# Altium PCB 12V-036A3（7X7）-WaterPump-200W-V1.0.PcbDoc (part 1 of 2)
Units mm, origin at the board's own origin, x right, y up, seen from the top; angles counter-clockwise.
Board outline 61.5 x 61.42 mm, 4 copper layers (Top Layer, Signal Layer 1, Signal Layer 2, Bottom Layer), stack 0.778 mm thick; 140 components, 56 nets, 337 pads, 796 vias.
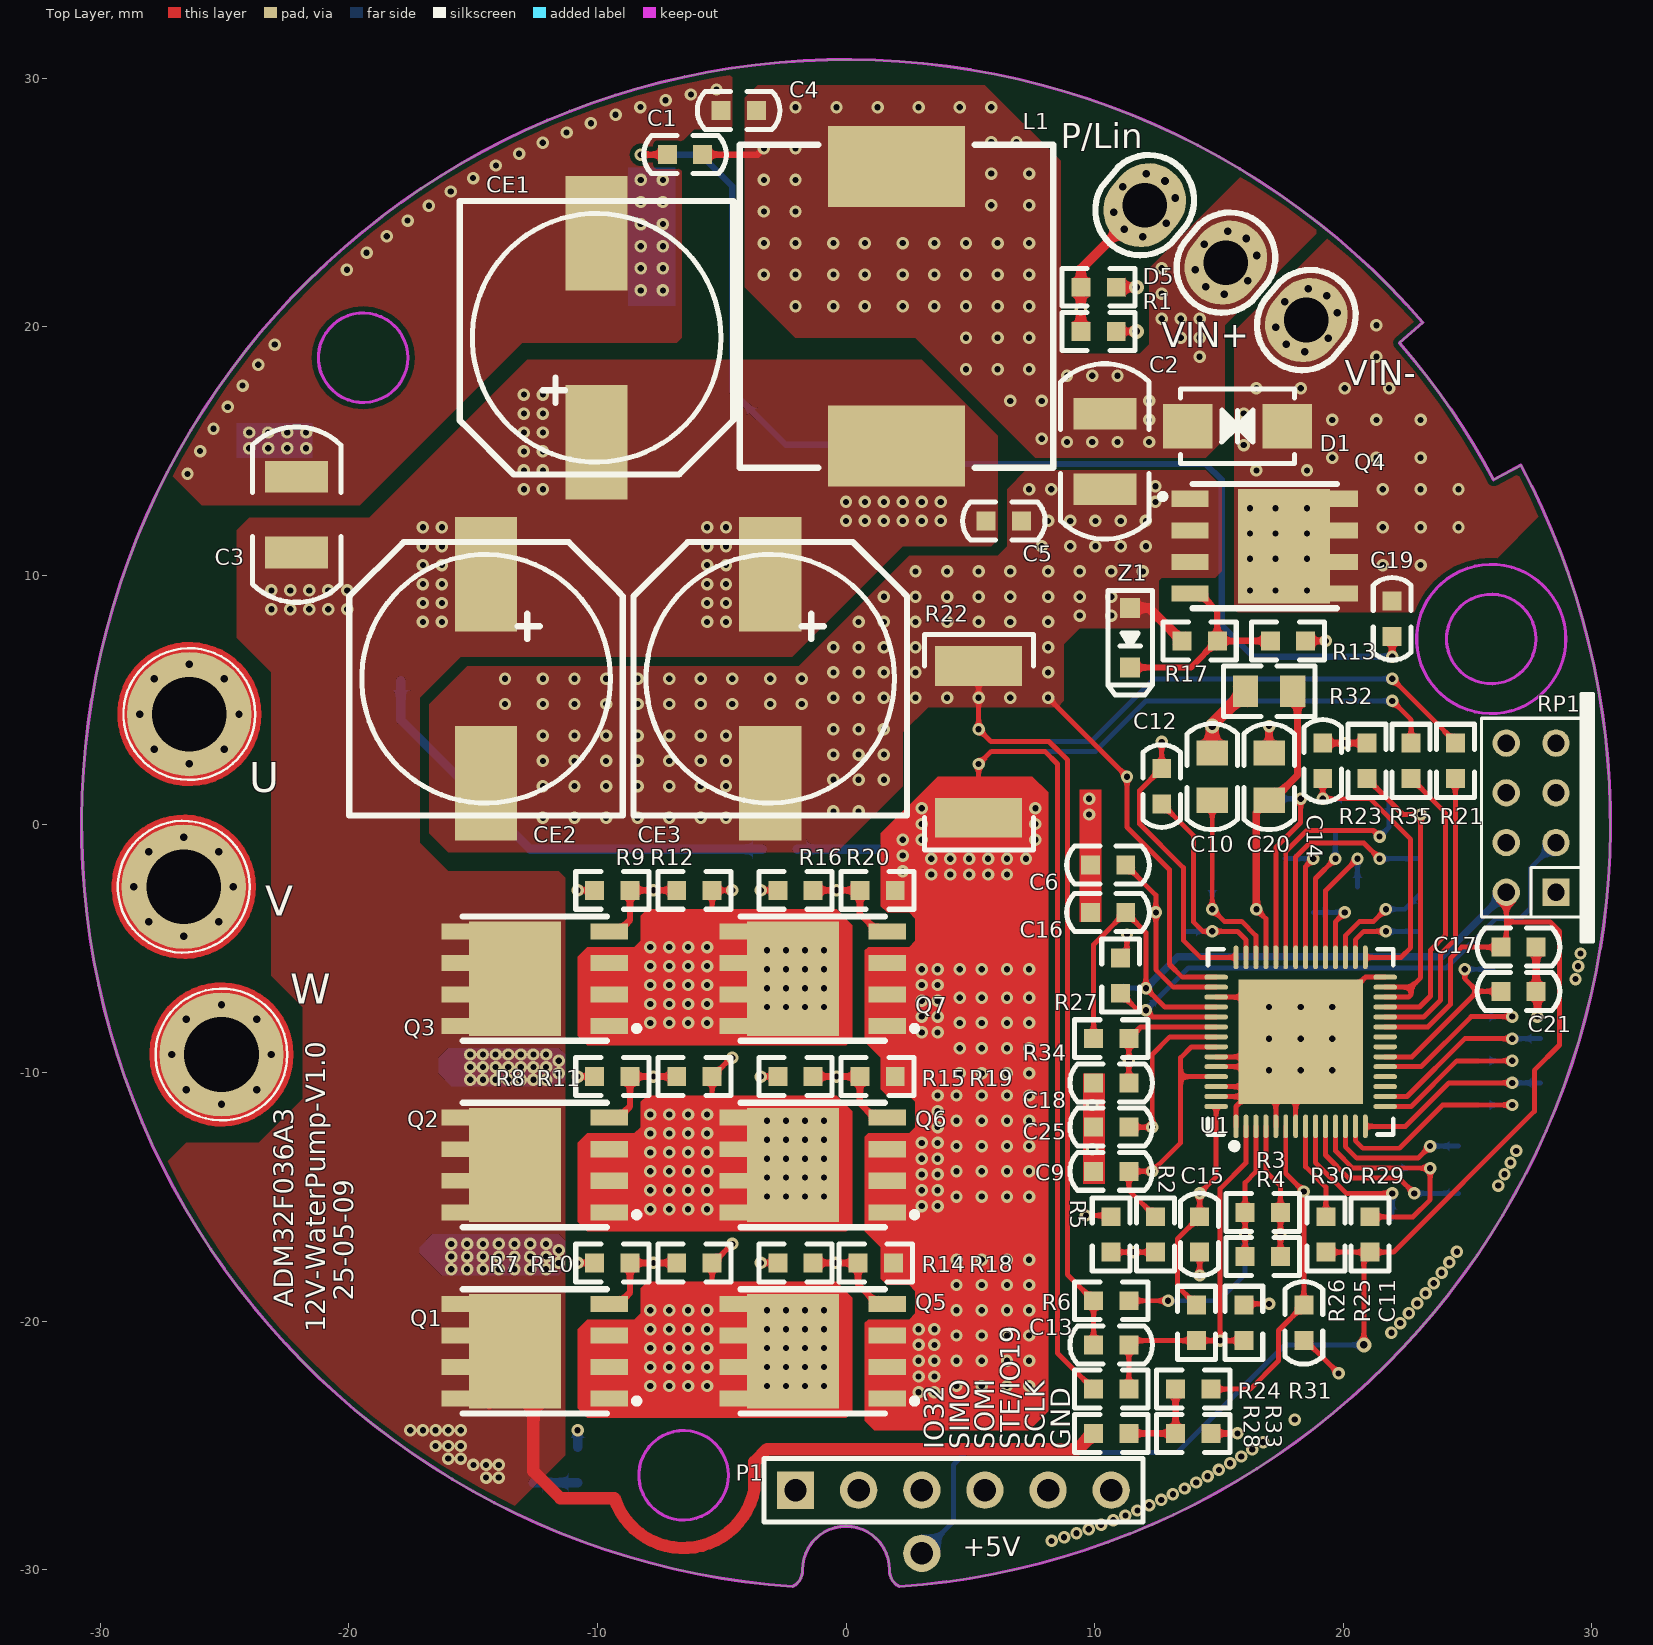
[diagram p0: Top Layer view]
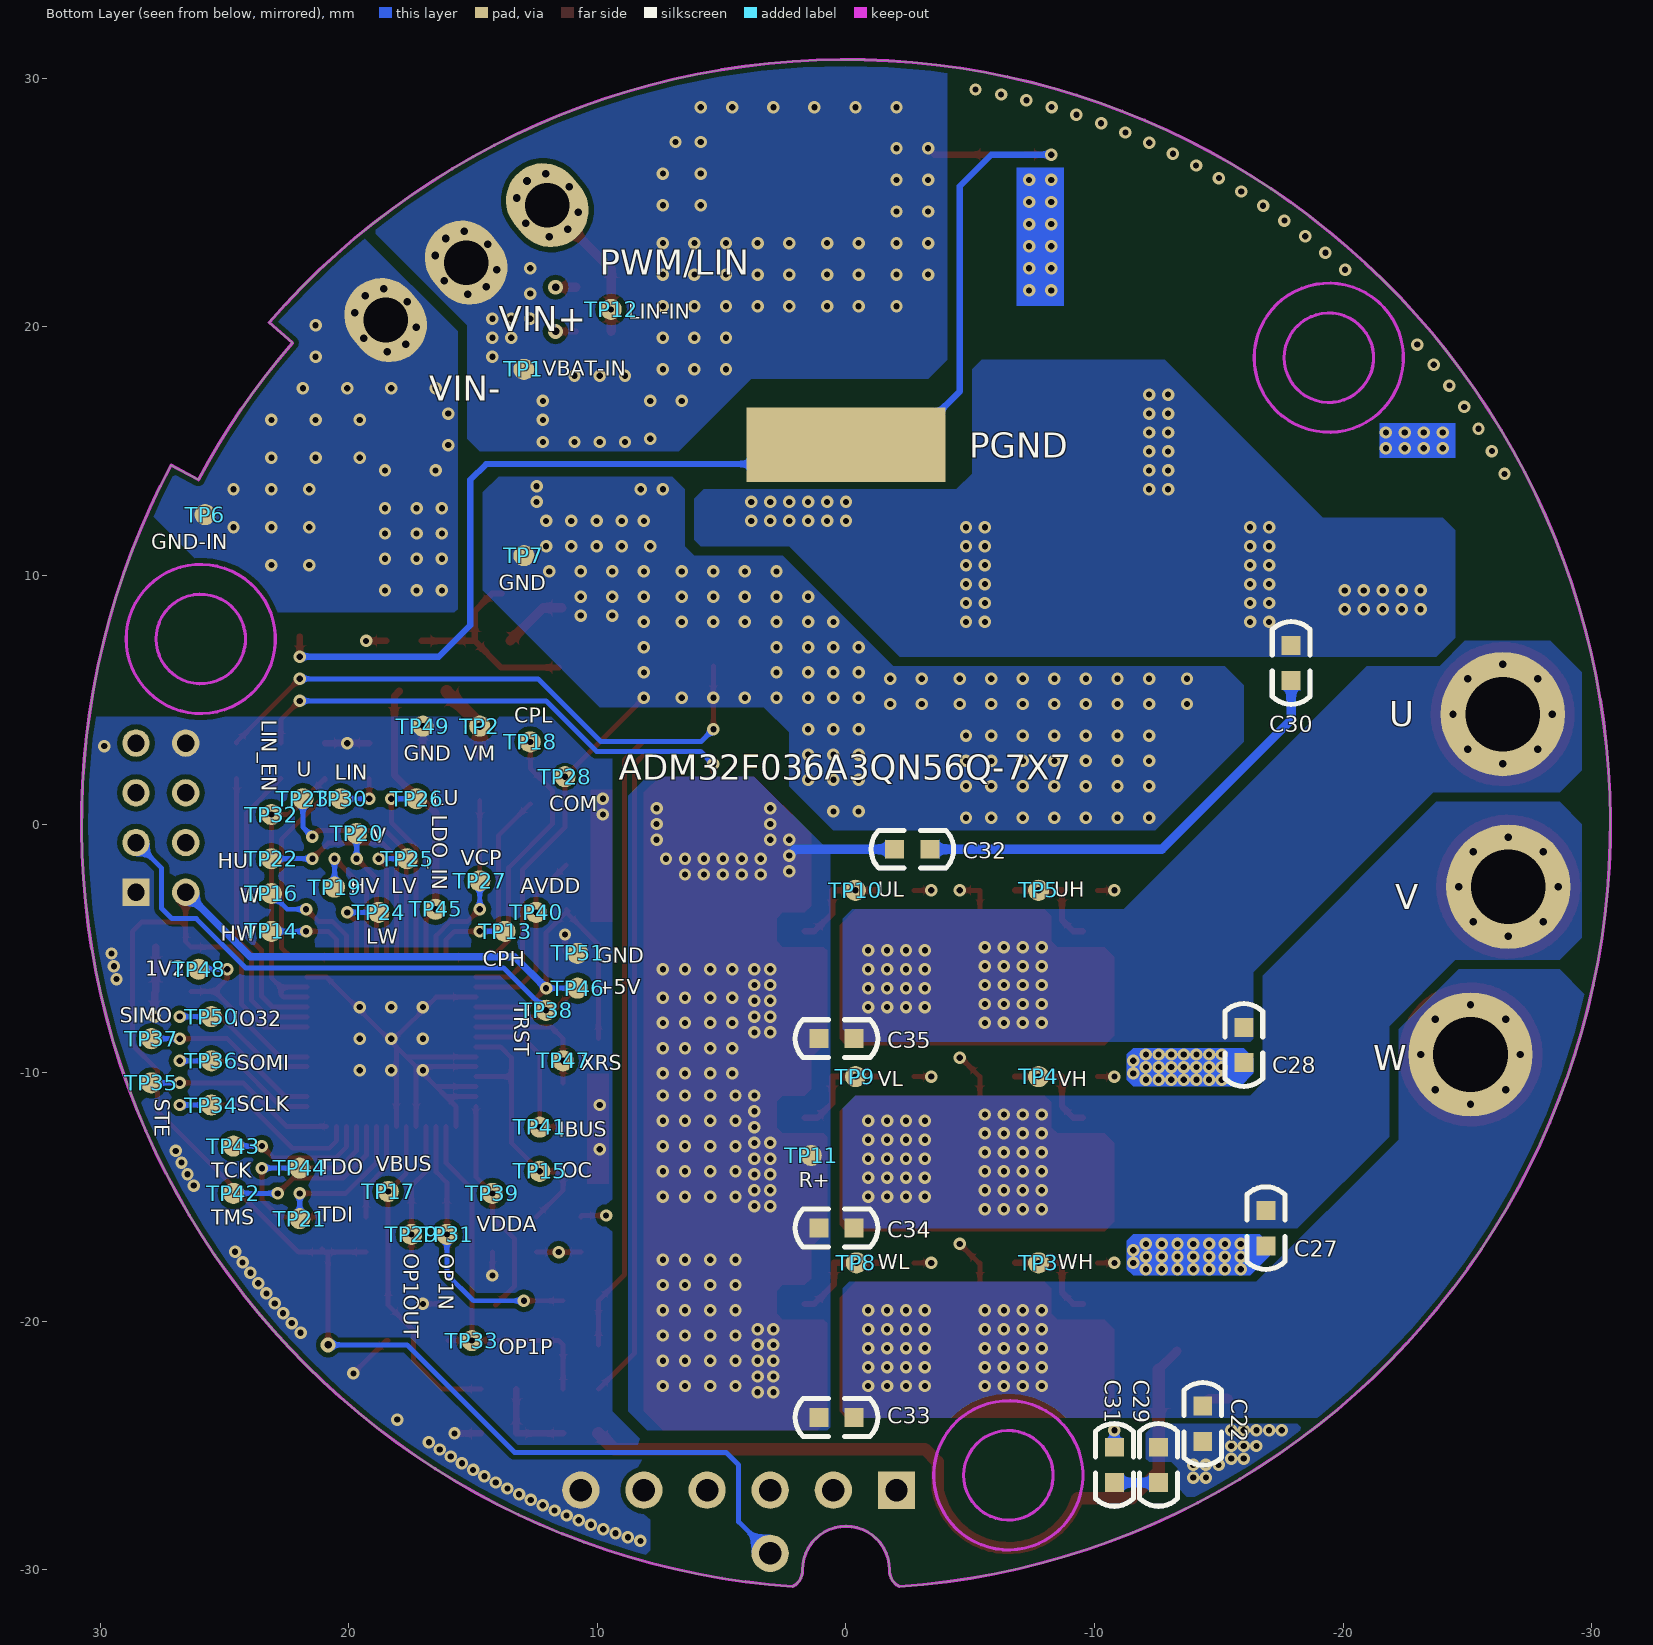
[diagram p1: Bottom Layer view, seen from below]
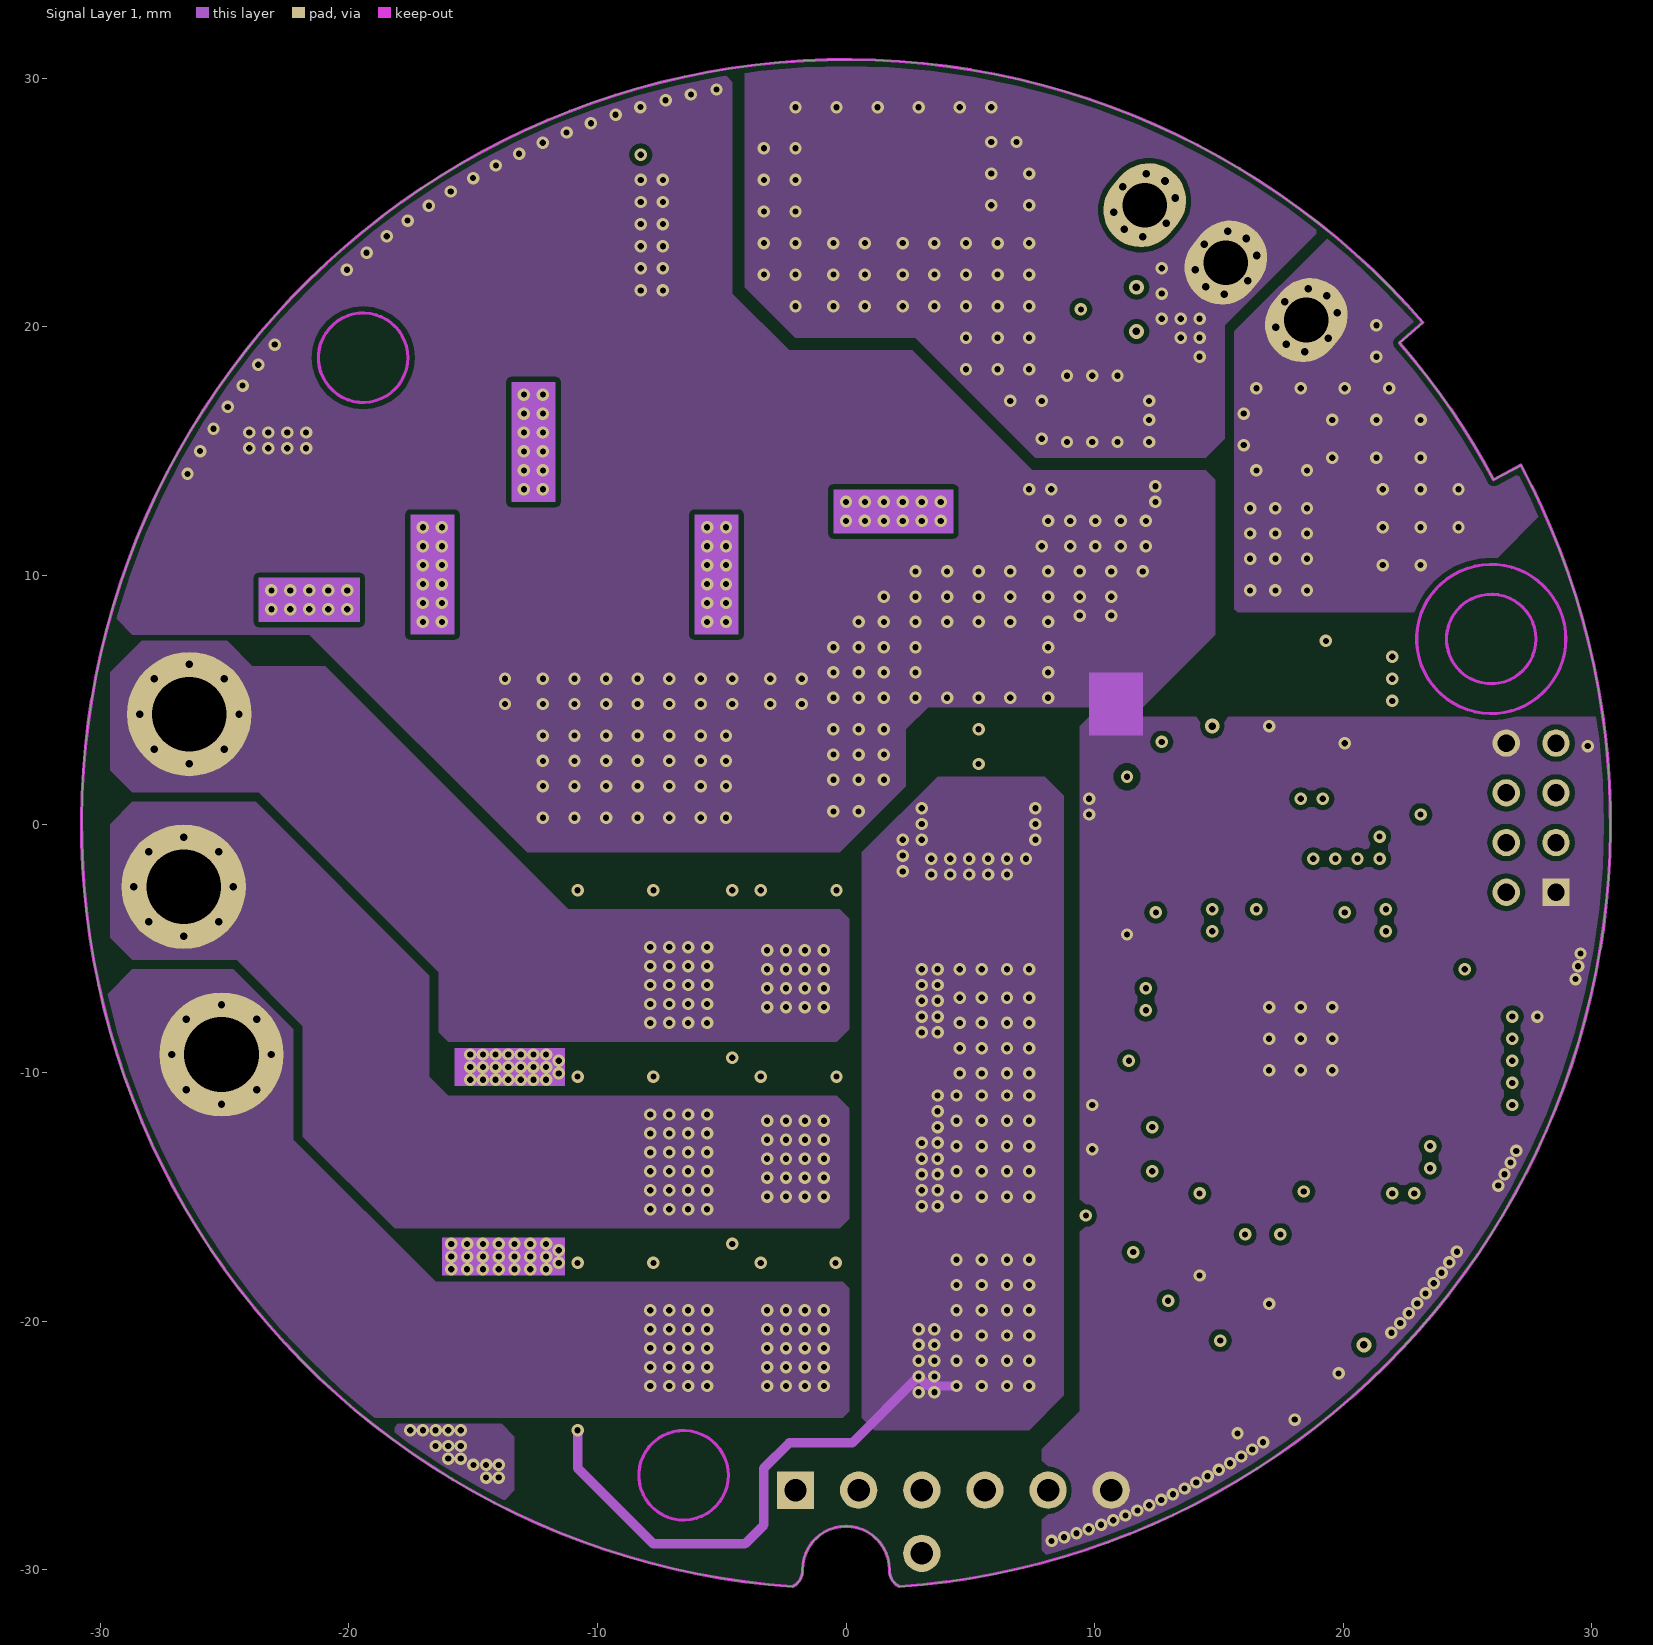
[diagram p2: Signal Layer 1]
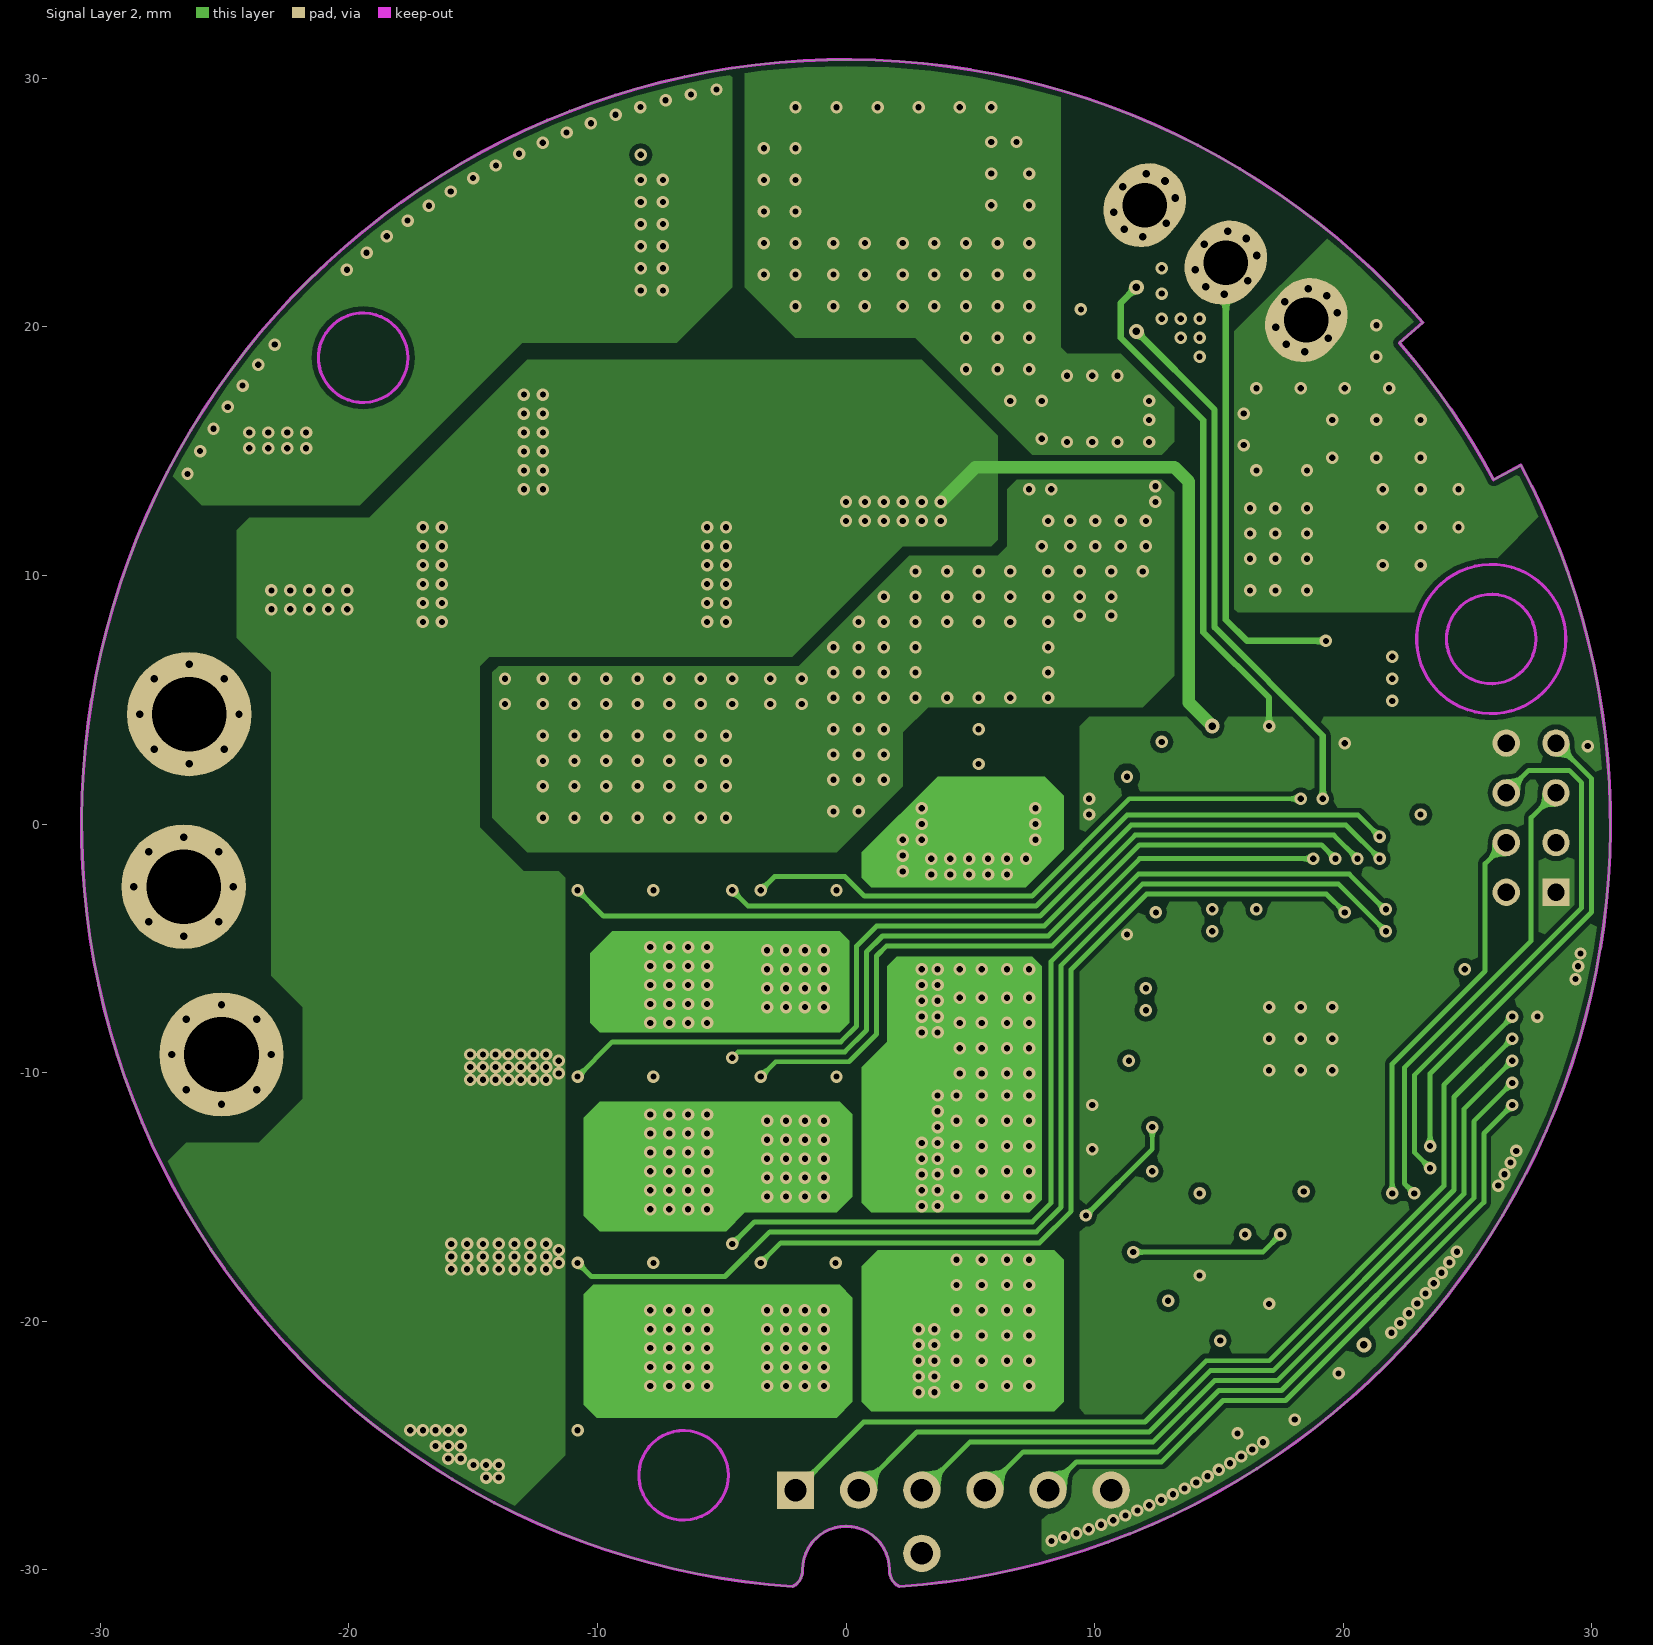
[diagram p3: Signal Layer 2]

## Layer stack, top to bottom
Top Solder: solder mask 0.0102, Solder Resist, Dk 3.5
Top Layer: signal copper 0.0356
Dielectric 1: core 0.254, FR-4, Dk 4.2
Signal Layer 1: signal copper 0.036
Dielectric 3: prepreg 0.127, Dk 4.2
Signal Layer 2: signal copper 0.036
Dielectric 2: core 0.254, Dk 4.2
Bottom Layer: signal copper 0.0356
Bottom Solder: solder mask 0.0102, Solder Resist, Dk 3.5

## Board outline
-2.145,-30.675 ccw(c-2.484,-30.024) -1.75,-30 cw(c0,-30) 1.75,-30 ccw(c2.484,-30.024) 2.145,-30.675 ccw(c0,0) 27.151,14.436 26.047,13.849 ccw(c0,0) 22.264,19.354 23.207,20.174 ccw(c0,0)

## Design rules (kind name [scope] priority, off if disabled: settings)
Clearance [All] p1: gap=0.2 ignorepadtopadclearanceinfootprint=FALSE
PolygonConnect [All] p1: connectstyle=Direct reliefconductorwidth=0.254 reliefentries=4 polygonreliefangle="90 Angle" airgapwidth=0.254
RoutingVias [All] p1: holewidth=0.3 width=0.6 viastyle="Through Hole" minholewidth=0.1 minwidth=0.1 maxholewidth=0.711 maxwidth=1.27
SolderMaskExpansion [All] p1: expansion=0.102
Width [All] p1: maxlimit=2 minlimit=0.1 preferedwidth=0.2 minimp=50.000000 maximp=50.000000 favimp=50.000000
30 further rules are at their usual default settings.

## Components (designator, comment, footprint, x,y, rotation, side; value= is the part's Value field where it differs from the comment)
C1 "100nF" 0603C-X -6.477,26.924 r0 top
C2 "10uF/50V" 1210C-X 10.414,14.986 r270 top
C3 "10uF/50V" 1210C-X -22.098,12.446 r90 top
C4 "1nF" 0603C-X -4.318,28.702 r0 top
C5 "100nF" 0603C-X 6.35,12.192 r0 top
C6 "2.2uF" 0603C-X 10.541,-1.651 r180 top
C9 "1nF" 0603C-X 10.668,-13.97 r0 top
C10 "2.2uF" 0805C-X 14.732,1.905 r90 top
C11 "100nF" 0603C-X 18.415,-20.066 r90 top
C12 "100nF" 0603C-X 12.7,1.524 r90 top
C13 "100pF" 0603C-X 10.668,-20.955 r180 top
C14 "100pF" 0603C-X 19.177,2.54 r90 top
C15 "2.2uF" 0603C-X 14.224,-16.51 r90 top
C16 "100nF" 0603C-X 10.541,-3.556 r0 top
C17 "2.2uF" 0603C-X 27.051,-4.953 r180 top
C18 "100nF" 0603C-X 10.668,-10.414 r180 top
C19 "100nF" 0603C-X 21.971,8.255 r270 top
C20 "10uF" 0805C-X 17.018,1.905 r270 top
C21 "2.2uF" 0603C-X 27.051,-6.731 r180 top
C22 "3.3nF" 0603C-X -14.351,-24.13 r90 bottom
C25 "2.2uF" 0603C-X 10.668,-12.192 r0 top
C27 "3.3nF" 0603C-X -16.891,-16.256 r90 bottom
C28 "3.3nF" 0603C-X -16.002,-8.89 r90 bottom
C29 "100nF" 0603C-X -12.573,-25.781 r270 bottom
C30 "100nF" 0603C-X -17.907,6.477 r270 bottom
C31 "100nF" 0603C-X -10.795,-25.781 r90 bottom
C32 "100nF" 0603C-X -2.667,-1.016 r0 bottom
C33 "3.3nF" 0603C-X 0.381,-23.876 r0 bottom
C34 "3.3nF" 0603C-X 0.381,-16.256 r0 bottom
C35 "3.3nF" 0603C-X 0.381,-8.636 r0 bottom
CE1 "330uF/35V" CAP_SMD10*10.5 -10.033,19.558 r180 top
CE2 "330uF/35V" CAP_SMD10*10.5 -14.478,5.842 r0 top
CE3 "330uF/35V" CAP_SMD10*10.5 -3.048,5.842 r0 top
D1 "SMAJ30CA" SMA 15.748,16.002 r180 top
D5 "CT0603S14AHSG" 0603R-X 10.16,21.59 r180 top
L1 "MDA1365-1R5M" "L 13.5*12.6*6.2" 2.032,20.828 r270 top
P1 "Header 6" HDR1X6 -2.032,-26.797 r0 top
P/Lin "HOLD" HP-1.4*3.5MM 12.014,24.892 r140 top
PGND "HOLD" M3*8 0,15.25 r180 top
Q1 "JMSH0401AGQ" "QFN5*6 （N）" -12.446,-21.209 r90 top
Q2 "JMSH0401AGQ" "QFN5*6 （N）" -12.446,-13.716 r90 top
Q3 "JMSH0401AGQ" "QFN5*6 （N）" -12.446,-6.223 r90 top
Q4 "JMSH0401AGQ" "QFN5*6 （N）" 16.764,11.176 r270 top
Q5 "JMSH0401AGQ" "QFN5*6 （N）" -1.27,-21.209 r90 top
Q6 "JMSH0401AGQ" "QFN5*6 （N）" -1.27,-13.716 r90 top
Q7 "JMSH0401AGQ" "QFN5*6 （N）" -1.27,-6.223 r90 top
R1 "1K/100Mhz" 0603R-X 10.16,19.812 r0 top
R2 "100Ω" 0603R-X 12.446,-16.51 r90 top
R3 "30KΩ" 0603R-X 16.764,-15.621 r0 top
R4 "30KΩ" 0603R-X 16.764,-17.399 r0 top
R5 "1KΩ" 0603R-X 10.668,-16.51 r90 top
R6 "1KΩ" 0603R-X 10.668,-19.177 r0 top
R7 "22R" 0603R-X -9.398,-17.653 r180 top
R8 "22R" 0603R-X -9.398,-10.16 r180 top
R9 "22R" 0603R-X -9.398,-2.667 r180 top
R10 "10K/5%" 0603R-X -6.096,-17.653 r180 top
R11 "10K/5%" 0603R-X -6.096,-10.16 r180 top
R12 "10K/5%" 0603R-X -6.096,-2.667 r180 top
R13 "10KΩ" 0603R-X 17.78,7.366 r0 top
R14 "22R" 0603R-X -2.032,-17.653 r180 top
R15 "22R" 0603R-X -2.032,-10.16 r180 top
R16 "22R" 0603R-X -2.032,-2.667 r180 top
R17 "100KΩ" 0603R-X 14.224,7.366 r0 top
R18 "10K/5%" 0603R-X 1.194,-17.653 r180 top
R19 "10K/5%" 0603R-X 1.27,-10.16 r180 top
R20 "10K/5%" 0603R-X 1.27,-2.667 r180 top
R21 "0Ω" 0603R-X 24.511,2.54 r270 top
R22 "2.5mR/1%/3W" 2512R-X 5.334,3.302 r270 top
R23 "2.2KΩ" 0603R-X 20.955,2.54 r90 top
R24 "1KΩ" 0603R-X 10.668,-22.733 r0 top
R25 "30KΩ" 0603R-X 16.002,-20.066 r270 top
R26 "30KΩ" 0603R-X 14.097,-20.066 r90 top
R27 "2.2KΩ" 0603R-X 11.049,-6.096 r270 top
R28 "10KΩ" 0603R-X 10.668,-24.511 r0 top
R29 "10KΩ" 0603R-X 21.082,-16.51 r90 top
R30 "10KΩ" 0603R-X 19.304,-16.51 r90 top
R31 "1KΩ" 0603R-X 13.97,-22.733 r0 top
R32 "0Ω" 0805R-X 17.018,5.334 r180 top
R33 "680Ω" 0603R-X 13.97,-24.511 r0 top
R34 "10KΩ" 0603R-X 10.668,-8.636 r180 top
R35 "0Ω" 0603R-X 22.733,2.54 r270 top
RP1 "XH2.0-4x2P" DIP2.0-2*4 27.559,0.254 r180 top locked
TP1 "TEST-Point" TP_SMT-1#1 12.954,18.288 r90 bottom
TP2 "TEST-Point" TP_SMT-1#1 14.732,3.937 r90 bottom
TP3 "TEST-Point" TP_SMT-1#1 -7.747,-17.653 r90 bottom
TP4 "TEST-Point" TP_SMT-1#1 -7.747,-10.16 r90 bottom
TP5 "TEST-Point" TP_SMT-1#1 -7.747,-2.667 r90 bottom
TP6 "TEST-Point" TP_SMT-1#1 25.781,12.446 r90 bottom
TP7 "TEST-Point" TP_SMT-1#1 12.954,10.795 r90 bottom
TP8 "TEST-Point" TP_SMT-1#1 -0.419,-17.653 r90 bottom
TP9 "TEST-Point" TP_SMT-1#1 -0.381,-10.16 r90 bottom
TP10 "TEST-Point" TP_SMT-1#1 -0.381,-2.667 r90 bottom
TP11 "TEST-Point" TP_SMT-1#1 1.397,-13.335 r90 bottom
TP12 "TEST-Point" TP_SMT-1#1 9.449,20.701 r90 bottom
TP13 "TEST-Point" TP_SMT-1#1 13.716,-4.318 r90 bottom
TP14 "TEST-Point" TP_SMT-1#1 23.114,-4.318 r90 bottom
TP15 "TEST-Point" TP_SMT-1#1 12.319,-13.97 r90 bottom
TP16 "TEST-Point" TP_SMT-1#1 23.114,-2.794 r90 bottom
TP17 "TEST-Point" TP_SMT-1#2 18.415,-14.656 r90 bottom
TP18 "TEST-Point" TP_SMT-1#1 12.7,3.302 r90 bottom
TP19 "TEST-Point" TP_SMT-1#1 20.574,-2.54 r90 bottom
TP20 "TEST-Point" TP_SMT-1#1 19.685,-0.381 r90 bottom
TP21 "TEST-Point" TP_SMT-1#1 21.971,-15.875 r90 bottom
TP22 "TEST-Point" TP_SMT-1#1 23.114,-1.397 r90 bottom
TP23 "TEST-Point" TP_SMT-1#1 21.844,1.016 r90 bottom
TP24 "TEST-Point" TP_SMT-1#1 18.796,-3.556 r90 bottom
TP25 "TEST-Point" TP_SMT-1#1 17.653,-1.397 r90 bottom
TP26 "TEST-Point" TP_SMT-1#1 17.272,1.016 r90 bottom
TP27 "TEST-Point" TP_SMT-1#1 14.732,-2.286 r90 bottom
TP28 "TEST-Point" TP_SMT-1#1 11.303,1.905 r90 bottom
TP29 "TEST-Point" TP_SMT-1#1 17.475,-16.51 r90 bottom
TP30 "TEST-Point" TP_SMT-1#1 20.32,1.016 r90 bottom
TP31 "TEST-Point" TP_SMT-1#1 16.053,-16.51 r90 bottom
TP32 "TEST-Point" TP_SMT-1#1 23.114,0.381 r90 bottom
TP33 "TEST-Point" TP_SMT-1#1 15.05,-20.777 r90 bottom
TP34 "TEST-Point" TP_SMT-1#1 25.527,-11.303 r90 bottom
TP35 "TEST-Point" TP_SMT-1#1 27.94,-10.414 r90 bottom
TP36 "TEST-Point" TP_SMT-1#1 25.527,-9.525 r90 bottom
TP37 "TEST-Point" TP_SMT-1#1 27.94,-8.636 r90 bottom
TP38 "TEST-Point" TP_SMT-1#1 12.065,-7.493 r90 bottom
TP39 "TEST-Point" TP_SMT-1#1 14.224,-14.859 r90 bottom
TP40 "TEST-Point" TP_SMT-1#1 12.465,-3.556 r90 bottom
TP41 "TEST-Point" TP_SMT-1#1 12.319,-12.192 r90 bottom
TP42 "TEST-Point" TP_SMT-1#1 24.638,-14.859 r90 bottom
TP43 "TEST-Point" TP_SMT-1#1 24.638,-12.954 r90 bottom
TP44 "TEST-Point" TP_SMT-1#1 21.971,-13.843 r90 bottom
TP45 "TEST-Point" TP_SMT-1#1 16.51,-3.429 r90 bottom
TP46 "TEST-Point" TP_SMT-1#1 10.795,-6.604 r90 bottom
TP47 "TEST-Point" TP_SMT-1#1 11.379,-9.525 r90 bottom
TP48 "TEST-Point" TP_SMT-1#1 26.035,-5.842 r90 bottom
TP49 "TEST-Point" TP_SMT-1#1 17.018,3.937 r90 bottom
TP50 "TEST-Point" TP_SMT-1#1 25.527,-7.747 r90 bottom
TP51 "TEST-Point" TP_SMT-1#1 10.795,-5.207 r90 bottom
U "HOLD" HP-3*5 -26.416,4.42 r90 top
U1 "ADM32F036A3A_1" QFN56-7X7-04P 18.288,-8.763 r90 top locked
V "HOLD" HP-3*5 -26.641,-2.524 r90 top
VIN+ "HOLD" HP-1.4*3.5MM 15.28,22.58 r140 top
VIN- "HOLD" HP-1.4*3.5MM 18.517,20.269 r140 top
W "HOLD" HP-3*5 -25.121,-9.271 r90 top
Z1 "BZT52C9V1S" DIO-SOD323-X 11.43,7.493 r270 top

## Footprints (in the part's own frame and the unit in brackets; to place one, negate y for a bottom-side part, rotate by r counter-clockwise, add the part's x,y. Pads: shape width x height; smd on the part's side, far side on the other; paste and mask are expansions set on the pad)
0603C-X [mil]
  rect 30x30 smd: 1(-28,0) 2(28,0)
  silkscreen extent -65,-30 65,30
0603R-X [mil]
  rect 30x30 smd: 1(-28,0) 2(28,0)
  silkscreen extent -58,-30 58,30
0805C-X [mil]
  rect 40x50 smd: 1(-37.5,0) 2(37.5,0)
  silkscreen extent -84,-40 84,40
0805R-X [mil]
  rect 40x50 smd: 1(-37.5,0) 2(37.5,0)
  silkscreen extent -72,-40 72,40
1210C-X [mil]
  rect 50x100 smd: 1(-60,0) 2(60,0)
  silkscreen extent -139,-70 139,70
2512R-X [mm]
  rect 1.6x3.5 smd: 1(-3.05,0) 2(3.05,0)
  silkscreen extent -4.32,-2.18 4.35,2.21
CAP_SMD10*10.5 [mm]
  rect 2.5x4.6 smd: 1(0,4.2) 2(0,-4.2)
  silkscreen extent -5.5,-5.5 5.5,5.5, body extent -5.23,-5.88 5.07,5.72, height 10.2
DIO-SOD323-X [mm]
  rect 0.8x0.8 smd: 1(-1.2,0) 2(1.2,0)
  silkscreen extent -1.9,-0.9 2.3,0.9
DIP2.0-2*4 [mm]
  rect 1.1x1.1 hole 0.7 mask+0.102: 1(-1,3)
  round 1.1 hole 0.7 mask+0.102: 2(1,3) 3(-1,1) 4(1,1) 5(-1,-1) 6(1,-1) 7(-1,-3) 8(1,-3)
  silkscreen extent -2.5,-5 2,5
HDR1X6 [mm] "Connector; Header; 6 Position"
  rect 1.5x1.5 hole 0.9: 1(0,0)
  round 1.5 hole 0.9: 2(2.54,0) 3(5.08,0) 4(7.62,0) 5(10.16,0) 6(12.7,0)
  silkscreen extent -1.27,-1.27 13.97,1.27
HP-1.4*3.5MM [mm]
  oval 3x3.5 hole 1.8 mask+0.102: 1(0,0)
  silkscreen extent -1.8,-2.07 1.8,2.07
HP-3*5 [mm]
  round 5 hole 3: 1(0,0)
  silkscreen extent -2.65,-2.65 2.65,2.65
"L 13.5*12.6*6.2" [mm]
  rect 3.25x5.5 smd: 1(-5.625,0) 2(5.625,0)
  silkscreen extent -6.5,-6.3 6.5,6.3, body extent -6.5,-6.3 6.5,6.3, height 6.2
M3*8 [mm]
  rect 8x3 smd far side: 1(0,0)
"QFN5*6 （N）" [mm]
  rect 0.65x1.5 smd mask+0.051: 1(-1.905,-2.925) 2(-0.635,-2.925) 3(0.635,-2.925) 4(1.905,-2.925)
  rect 0.65x1.8 smd mask+0.051: 5(1.905,2.925) 8(-1.905,2.925)
  rect 0.635x1.8 smd mask+0.051: 6(0.635,2.925) 7(-0.635,2.925)
  rect 4.6x3.7 smd mask+0.051: 9(0,0.864)
  silkscreen extent -2.5,-4.13 2.5,2.98, body extent -2.52,-2.94 2.61,3.11, height 1.05
QFN56-7X7-04P [mm]
  oval 0.95x0.2 smd mask+0.051: 1(-3.4,2.6) 2(-3.4,2.2) 3(-3.4,1.8) 4(-3.4,1.4) 5(-3.4,1) 6(-3.4,0.6) 7(-3.4,0.2) 8(-3.4,-0.2) 9(-3.4,-0.6) 10(-3.4,-1) 11(-3.4,-1.4) 12(-3.4,-1.8) 13(-3.4,-2.2) 14(-3.4,-2.6) 29(3.4,-2.6) 30(3.4,-2.2) 31(3.4,-1.8) 32(3.4,-1.4) 33(3.4,-1) 34(3.4,-0.6) 35(3.4,-0.2) 36(3.4,0.2) 37(3.4,0.6) 38(3.4,1) 39(3.4,1.4) 40(3.4,1.8) 41(3.4,2.2) 42(3.4,2.6)
  oval 0.2x0.95 smd mask+0.051: 15(-2.6,-3.4) 16(-2.2,-3.4) 17(-1.8,-3.4) 18(-1.4,-3.4) 19(-1,-3.4) 20(-0.6,-3.4) 21(-0.2,-3.4) 22(0.2,-3.4) 23(0.6,-3.4) 24(1,-3.4) 25(1.4,-3.4) 26(1.8,-3.4) 27(2.2,-3.4) 28(2.6,-3.4) 43(2.6,3.4) 44(2.2,3.4) 45(1.8,3.4) 46(1.4,3.4) 47(1,3.4) 48(0.6,3.4) 49(0.2,3.4) 50(-0.2,3.4) 51(-0.6,3.4) 52(-1,3.4) 53(-1.4,3.4) 54(-1.8,3.4) 55(-2.2,3.4) 56(-2.6,3.4)
  rect 5x5 smd mask+0.051: 57(0,0)
  silkscreen extent -4.32,-3.72 3.73,3.73, body extent -3.65,-3.65 3.66,3.66, height 1
SMA [mm]
  rect 2x1.8 smd: 1(-2,0) 2(2,0)
  silkscreen extent -2.3,-1.5 2.3,1.5
TP_SMT-1#1 [mm]
  round 0.85 smd: 1(0,0)
TP_SMT-1#2 [mm]
  round 0.85 smd: 1(-0.127,0)

## Part data
C1 C2 C3 C4 C5 C6 C9 C10 C11 C12 C13 C14 C15 C16 C17 C18 C19 C20 C21 C22 C25 C27 C28 C29 C30 C31 C32 C33 C34 C35: library part Cap, "贴片电容", LatestRevisionDate=17-Jul-2002, LatestRevisionNote="Re-released for DXP Platform.", Published=8-Jun-2000, Publisher="Altium Limited"
CE1 CE2 CE3: library part ELEC, "高温电解220UF/50V_8*16_RE环*"
D1 D5: library part SMCJ26CA, JLCPCB Part Class="Extended Part", Manufacturer=PAKER(派克微), Add into BOM=yes, Convert to PCB=yes, Datasheet=https://atta.szlcsc.com/upload/public/pdf/source/20220607/6FBEE1574BED151AFE72B096AAF02965.pdf, Device=SMCJ26CA, LCSC Part Name=SMCJ26CA, Manufacturer Part=SMCJ26CA, Name=2, NUMBER=2, Pin Type=IN, Supplier=LCSC, Supplier Footprint=SMC, Supplier Part=C3012577, Symbol=SMCJ26CA_C3012577
L1: library part Inductor, "Inductor", Code_IEC=1005, Code_JEITA=0402, LatestRevisionDate=29-May-2009, LatestRevisionNote="IPC-7351 Footprint Added.", PackageDescription="Chip Inductor", PackageReference=0402-A, Published=8-Jun-2000, Publisher="Altium Limited"
P1: "Header, 6-Pin", LatestRevisionDate=17-Jul-2002, LatestRevisionNote="Re-released for DXP Platform.", Publisher="Altium Limited"
P/Lin PGND U V VIN+ VIN- W: library part CON2
Q1 Q2 Q3 Q4 Q5 Q6 Q7: library part BSC190N15NS3G, "30V 150A"
R1 R2 R3 R4 R5 R6 R13 R17 R21 R23 R24 R25 R26 R27 R28 R29 R30 R31 R32 R33 R34 R35: library part Res, "贴片电阻", LatestRevisionDate=17-Jul-2002, LatestRevisionNote="Re-released for DXP Platform.", Published=8-Jun-2000, Publisher="Altium Limited"
R7 R8 R9 R10 R11 R12 R14 R15 R16 R18 R19 R20: library part RZ
R22: library part RES(S, "SMT电阻RR2512_0R05_F_1W_200V_环保 ZH", SYS ID=120101451
RP1: "------", Add into BOM=yes, Convert to PCB=yes, Design Item ID=CON4X2, Device=XH2.0-4x2P, Name=XH2.0-4x2P, Origin Footprint=DIP2.0-2*4, Symbol=CON4X2
U1: "进芯电机驱动专用芯片"
Z1: library part ZENER1, "Zener Diode"

## Free pads (board coordinates)
  round 1.5 hole 0.9: 1(3.048,-29.337)

## Via types
v1: diameter 0.5, hole 0.25, Top Layer to Bottom Layer, tented both sides, 744 vias
v2: diameter 0.6, hole 0.3, Top Layer to Bottom Layer, tented both sides, 28 vias
v3: diameter 0.61, hole 0.305, Top Layer to Bottom Layer, 24 vias

## Nets (pads, with @x,y where several pads share a name; then routed paths per layer and width w, separated by ;. In a path a pad name is that pad's centre, name@x,y a point inside that pad or via, vN(x,y) a via of type N, cw(c..) or ccw(c..) an arc to the next point about the centre after c; other vN are vias at no path point)
AVDD: C6.1 TP40.1 U1.44 | length 7.4
  Top Layer w0.2: C6.1@11.252,-1.651 12.465,-2.864 12.465,-5.861 13.167,-6.563 U1.44@14.888,-6.563
  other v1: 12.465,-3.556
CPH: C12.1 TP13.1 U1.41 | length 9.4
  Top Layer w0.2: C12.1@12.7,0.813 13.97,-0.457 13.97,-3.937 14.351,-4.318 v1(14.732,-4.318) 15.748,-4.318 16.088,-4.658 U1.41@16.088,-5.363
  Bottom Layer w0.2: TP13.1@13.716,-4.318 v1(14.732,-4.318)
CPL: C12.2 TP18.1 U1.42 | length 11.5
  Top Layer w0.2: v1(12.7,3.302) C12.2@12.7,2.235 11.811,1.346 11.811,0 13.57,-1.759 13.57,-4.68 14.253,-5.363 U1.42@15.688,-5.363
GND: C2.2 C3.2 C4.1 C5.2 C6.2 C9.1 C11.1 C13.2 C14.2 C15.1 C16.1 C17.1 C18.2 C20.1 C21.1 C25.1 CE1.2 CE2.2 CE3.2 D5.1 P1.6 Q4.1 Q4.2 Q4.3 R6.1 R17.1 R21.1 R22.1 R23.2 R25.1 R27.1 R33.2 RP1.1 RP1.8 TP7.1 TP28.1 TP49.1 TP51.1 U1.1 U1.5 U1.7 U1.28 U1.43 U1.45 U1.51 U1.52 U1.54 U1.55 U1.57 Z1.1 | length 129.2
  Top Layer w0.2: R22.1@5.334,6.352 v1(5.334,5.08) v1(5.334,3.81) 5.823,3.321 8.167,3.321 8.909,2.579 8.909,-18.129 R6.1@9.957,-19.177 C13.2@9.957,-20.955 ; v1(8.128,5.08) v1(11.303,1.905) 11.303,-0.127 13.015,-1.839 13.015,-5.649 13.529,-6.163 U1.43@14.888,-6.163 ; R27.1@11.049,-5.385 11.303,-5.131 v1(11.303,-4.445) ; v1(14.224,-18.161) C15.1@14.224,-17.221 ; U1.55@14.888,-10.963 U1.57@16.088,-10.963 ; U1.54@14.888,-10.563 U1.57@16.488,-10.563 ; U1.52@14.888,-9.763 U1.57@17.288,-9.763 ; U1.51@14.888,-9.363 U1.57@17.688,-9.363 ; U1.45@14.888,-6.963 16.488,-6.963 U1.57@18.288,-8.763 ; U1.1@15.688,-12.163 15.688,-11.363 U1.57@16.088,-10.963 ; R25.1@16.002,-19.355 16.053,-19.304 v1(17.018,-19.304) ; U1.5@17.288,-12.163 U1.57@17.288,-9.763 ; U1.7@18.088,-12.163 U1.57@18.088,-8.963 ; C11.1@18.415,-20.777 18.491,-20.777 v1(19.812,-22.098) ; U1.28@21.688,-6.163 20.888,-6.163 U1.57@18.288,-8.763 ; v1(21.971,5.842) 24.511,3.302 R21.1@24.511,3.251 ; U1.57@16.088,-10.963 U1.57@16.488,-10.563 ; U1.57@16.488,-10.563 U1.57@17.288,-9.763 ; U1.57@17.288,-9.763 U1.57@17.688,-9.363 ; U1.57@17.688,-9.363 U1.57@18.088,-8.963 ; U1.57@18.088,-8.963 U1.57@18.288,-8.763
  Top Layer w0.254: R33.2@14.681,-24.511 v1(15.748,-24.511) ; C14.2@19.177,3.251 R23.2@20.955,3.251
  Top Layer w0.3: C20.1@17.018,2.857 v1(17.018,3.937) ; C17.1@27.762,-4.953 C21.1@27.762,-6.731 27.813,-6.782 v1(27.813,-7.747)
  Top Layer w0.381: D5.1@10.871,21.59 v2(11.684,21.59) ; Z1.1@11.43,8.693 12.186,8.693 R17.1@13.513,7.366
  Signal Layer 2 w0.254: v2(11.684,21.59) 11.049,20.955 11.049,19.558 14.372,16.235 14.372,7.719 17.018,5.073 v1(17.018,3.937)
  Bottom Layer w0.2: v1(5.334,3.81) 5.823,3.321 9.867,3.321 12.388,5.842 v1(21.971,5.842)
  other v1: 8.269,-28.838 8.771,-28.689 9.271,-28.532 9.767,-28.366 10.261,-28.191 10.751,-28.007 11.238,-27.816 11.722,-27.615 12.202,-27.406 12.679,-27.189 13.151,-26.964 13.62,-26.73 14.084,-26.488 14.544,-26.239 15,-25.981 15.451,-25.715 15.898,-25.441 16.339,-25.16 16.776,-24.871 18.054,-23.959 21.941,-20.46 22.294,-20.074 22.641,-19.682 22.981,-19.284 23.314,-18.88 23.64,-18.47 23.959,-18.054 24.271,-17.634 24.575,-17.207 26.239,-14.544 26.488,-14.084 26.73,-13.62 26.964,-13.151 9.906,-13.081 9.906,-11.303 17.018,-9.906 18.288,-9.906 19.558,-9.906 17.018,-8.636 18.288,-8.636 19.558,-8.636 17.018,-7.366 18.288,-7.366 19.558,-7.366 29.344,-6.237 29.449,-5.724 29.544,-5.209 -12.192,0.254 -10.922,0.254 -9.652,0.254 -8.382,0.254 -7.112,0.254 -5.842,0.254 -4.826,0.254 9.779,0.381 -0.508,0.508 0.508,0.508 9.779,1.016 -12.192,1.524 -10.922,1.524 -9.652,1.524 -8.382,1.524 -7.112,1.524 -5.842,1.524 -4.826,1.524 -0.508,1.778 0.508,1.778 1.524,1.778 -12.192,2.54 -10.922,2.54 -9.652,2.54 -8.382,2.54 -7.112,2.54 -5.842,2.54 -4.826,2.54 -0.508,2.794 0.508,2.794 1.524,2.794 29.836,3.136 20.066,3.251 -12.192,3.556 -10.922,3.556 -9.652,3.556 -8.382,3.556 -7.112,3.556 -5.842,3.556 -4.826,3.556 -0.508,3.81 0.508,3.81 1.524,3.81 -13.716,4.826 -12.192,4.826 -10.922,4.826 -9.652,4.826 -8.382,4.826 -7.112,4.826 -5.842,4.826 -4.572,4.826 -3.048,4.826 -1.778,4.826 -0.508,5.08 0.508,5.08 1.524,5.08 2.794,5.08 4.064,5.08 6.604,5.08 -13.716,5.842 -12.192,5.842 -10.922,5.842 -9.652,5.842 -8.382,5.842 -7.112,5.842 -5.842,5.842 -4.572,5.842 -3.048,5.842 -1.778,5.842 -0.508,6.096 0.508,6.096 1.524,6.096 2.794,6.096 8.128,6.096 -0.508,7.112 0.508,7.112 1.524,7.112 2.794,7.112 8.128,7.112 0.508,8.128 1.524,8.128 2.794,8.128 4.064,8.128 5.334,8.128 6.604,8.128 8.128,8.128 9.398,8.382 10.668,8.382 1.524,9.144 2.794,9.144 4.064,9.144 5.334,9.144 6.604,9.144 8.128,9.144 9.398,9.144 10.668,9.144 2.794,10.16 4.064,10.16 5.334,10.16 6.604,10.16 8.128,10.16 9.398,10.16 10.668,10.16 11.938,10.16 7.874,11.176 9.017,11.176 10.033,11.176 11.049,11.176 12.065,11.176 8.128,12.192 9.017,12.192 10.033,12.192 11.049,12.192 12.065,12.192 12.446,12.954 7.366,13.462 8.255,13.462 12.446,13.589 -26.488,14.084 -25.981,15 -24.003,15.113 -23.241,15.113 -22.479,15.113 -21.717,15.113 -24.003,15.748 -23.241,15.748 -22.479,15.748 -21.717,15.748 -25.441,15.898 -24.871,16.776 -24.271,17.634 -23.64,18.47 -22.981,19.284 -8.255,21.463 -7.366,21.463 -20.074,22.294 -8.255,22.352 -7.366,22.352 -19.284,22.981 -8.255,23.241 -7.366,23.241 -18.47,23.64 -8.255,24.13 -7.366,24.13 -17.634,24.271 -16.776,24.871 -8.255,25.019 -7.366,25.019 -15.898,25.441 -8.255,25.908 -7.366,25.908 -15,25.981 -14.084,26.488 -13.151,26.964 -12.202,27.406 -11.238,27.816 -10.261,28.191 -9.271,28.532 -8.269,28.838 -7.258,29.109 -6.237,29.344 -5.209,29.544
GPIO32: P1.1 TP50.1 U1.19 | length 46.3
  Top Layer w0.2: U1.19@21.688,-9.763 23.13,-9.763 25.146,-7.747 v1(26.797,-7.747)
  Signal Layer 2 w0.2: P1.1@-2.032,-26.797 0.711,-24.054 12.026,-24.054 14.49,-21.59 17.018,-21.59 24.054,-14.554 24.054,-10.49 v1(26.797,-7.747)
  Bottom Layer w0.2: TP50.1@25.527,-7.747 v1(26.797,-7.747)
HOU: R9.2 TP22.1 U1.36 | length 45
  Top Layer w0.2: v1(-10.795,-2.667) R9.2@-10.109,-2.667 ; U1.36@18.088,-5.363 18.088,-1.327 18.653,-0.762 20.828,-0.762 v1(21.463,-1.397)
  Signal Layer 2 w0.2: v1(-10.795,-2.667) -9.76,-3.702 7.811,-3.702 11.466,-0.047 20.113,-0.047 v1(21.463,-1.397)
  Bottom Layer w0.2: v1(21.463,-1.397) TP22.1@23.114,-1.397
HOV: R8.2 TP19.1 U1.33 | length 44
  Top Layer w0.2: v1(-10.795,-10.16) R8.2@-10.109,-10.16 ; U1.33@19.288,-5.363 19.288,-2.683 v1(20.574,-1.397)
  Signal Layer 2 w0.2: v1(-10.795,-10.16) -9.398,-8.763 -0.211,-8.763 0.427,-8.125 0.427,-4.907 1.232,-4.102 7.976,-4.102 11.631,-0.447 19.624,-0.447 v1(20.574,-1.397)
  Bottom Layer w0.2: TP19.1@20.574,-2.54 v1(20.574,-1.397)
HOW: R7.2 TP14.1 U1.30 | length 49.9
  Top Layer w0.2: v1(-10.795,-17.653) R7.2@-10.109,-17.653 ; U1.30@20.488,-5.363 20.488,-4.658 20.828,-4.318 v1(21.717,-4.318)
  Signal Layer 2 w0.2: v1(-10.795,-17.653) -10.245,-18.203 -4.868,-18.203 -3.067,-16.402 7.659,-16.402 8.655,-15.406 8.655,-5.686 11.922,-2.419 19.818,-2.419 v1(21.717,-4.318)
  Bottom Layer w0.2: v1(21.717,-4.318) TP14.1@23.114,-4.318
IBUS: C25.2 R5.2 TP41.1 U1.49 | length 12.4
  Top Layer w0.2: v1(9.652,-15.748) 10.617,-15.748 R5.2@10.668,-15.799 ; C25.2@11.379,-12.192 v1(12.319,-12.192) 12.319,-9.271 13.027,-8.563 U1.49@14.888,-8.563
  Signal Layer 2 w0.2: v1(9.652,-15.748) 12.319,-13.081 v1(12.319,-12.192)
LIN/PWM: D5.2 P/Lin.1 R1.1 TP12.1 | length 6.1
  Top Layer w0.381: R1.1@9.449,19.812 v1(9.449,20.701) D5.2@9.449,21.59 9.449,22.327 P/Lin.1@12.014,24.892
  other v3: 11.945,23.624 11.198,23.919 12.89,24.157 10.777,24.604 13.251,25.18 11.138,25.627 12.83,25.865 12.083,26.16
LIN_BUS/PWM-IN: C14.1 R1.2 TP30.1 U1.29 | length 35.2
  Top Layer w0.2: C14.1@19.177,1.829 v1(19.177,1.016) 21.082,1.016 22.714,-0.616 22.714,-4.972 22.323,-5.363 U1.29@20.888,-5.363
  Top Layer w0.254: R1.2@10.871,19.812 v2(11.684,19.812)
  Signal Layer 2 w0.254: v2(11.684,19.812) 14.826,16.67 14.826,7.907 19.177,3.556 v1(19.177,1.016)
  Bottom Layer w0.2: v1(19.177,1.016) TP30.1@20.32,1.016
LIN_EN: R23.1 TP32.1 U1.26 U1.27 | length 12.3
  Top Layer w0.2: R23.1@20.955,1.778 R23.1@20.955,1.829 22.403,0.381 v1(23.114,0.381) 23.114,-6.182 22.733,-6.563 ; U1.26@21.688,-6.963 22.628,-6.963 22.733,-6.858 22.733,-6.563 ; U1.27@21.688,-6.563 22.733,-6.563
LOU: R16.2 TP26.1 U1.38 | length 32.4
  Top Layer w0.2: v1(-3.429,-2.667) R16.2@-2.743,-2.667 ; U1.38@17.288,-5.363 17.288,-0.942 18.288,0.058 v1(18.288,1.016)
  Signal Layer 2 w0.2: v1(-3.429,-2.667) -2.879,-2.117 -0.042,-2.117 0.743,-2.902 7.479,-2.902 11.397,1.016 v1(18.288,1.016)
  Bottom Layer w0.2: TP26.1@17.272,1.016 v1(18.288,1.016)
LOV: R15.2 TP25.1 U1.35 | length 33.6
  Top Layer w0.2: v1(-3.429,-10.16) R15.2@-2.743,-10.16 ; U1.35@18.488,-5.363 18.488,-1.705 v1(18.796,-1.397)
  Signal Layer 2 w0.2: v1(-3.429,-10.16) -2.832,-9.563 0.121,-9.563 1.227,-8.457 1.227,-5.308 1.633,-4.902 8.308,-4.902 11.813,-1.397 v1(18.796,-1.397)
  Bottom Layer w0.2: TP25.1@17.653,-1.397 v1(18.796,-1.397)
LOW: R14.2 TP24.1 U1.32 | length 39.6
  Top Layer w0.2: v1(-3.429,-17.653) R14.2@-2.743,-17.653 ; U1.32@19.688,-5.363 19.688,-3.934 v1(20.066,-3.556)
  Signal Layer 2 w0.2: v1(-3.429,-17.653) -2.621,-16.845 7.781,-16.845 9.055,-15.571 9.055,-5.852 12.088,-2.819 19.329,-2.819 v1(20.066,-3.556)
  Bottom Layer w0.2: TP24.1@18.796,-3.556 v1(20.066,-3.556)
NetC1_1: C1.1 C19.2 PGND.1 | length 48.7
  Top Layer w0.254: v1(-8.255,26.924) C1.1@-7.188,26.924 ; v1(21.971,6.731) C19.2@21.971,7.544
  Bottom Layer w0.254: v1(-8.255,26.924) -5.842,26.924 -4.572,25.654 -4.572,17.399 -2.423,15.25 PGND.1@0,15.25 0.772,14.478 14.478,14.478 15.113,13.843 15.113,8.001 16.383,6.731 v1(21.971,6.731)
NetC19_1: C19.1 D1.1 Q4.5 Q4.6 Q4.7 Q4.8 Q4.9 TP6.1 VIN-.1
  other v1: 16.256,9.398 17.272,9.398 18.542,9.398 21.59,10.414 23.114,10.414 16.256,10.668 17.272,10.668 18.542,10.668 16.256,11.684 17.272,11.684 18.542,11.684 21.59,11.938 23.114,11.938 24.638,11.938 16.256,12.7 17.272,12.7 18.542,12.7 21.59,13.462 23.114,13.462 24.638,13.462 16.51,14.224 18.542,14.224 19.558,14.732 21.336,14.732 23.114,14.732 16.002,15.24 19.558,16.256 21.336,16.256 23.114,16.256 16.002,16.51 16.51,17.526 18.288,17.526 20.066,17.526 21.844,17.526 21.336,18.796 21.336,20.066
  other v3: 18.448,19.001 17.701,19.296 19.393,19.534 17.28,19.981 19.754,20.557 17.641,21.004 19.333,21.242 18.586,21.537
NetC20_2: C20.2 R32.1 TP45.1 U1.39 | length 11.7
  Top Layer w0.2: v1(16.51,-3.429) 16.888,-3.807 U1.39@16.888,-5.363
  Top Layer w0.3: v1(16.51,-3.429) 16.51,0.445 C20.2@17.018,0.953 17.145,0.953 18.161,1.968 18.161,5.143 R32.1@17.97,5.334
NetC29_2: C29.2 C31.1 | length 1.8
  Bottom Layer w0.381: C29.2@-12.573,-26.492 C31.1@-10.795,-26.492
NetC30_2: C30.2 C32.1 | length 18.3
  Bottom Layer w0.381: C30.2@-17.907,5.766 -17.907,4.191 -12.7,-1.016 C32.1@-3.378,-1.016
NetQ1_4: Q1.4 R7.1 R10.2 TP3.1 | length 4.1
  Top Layer w0.254: Q1.4@-9.521,-19.304 -9.144,-19.304 -8.687,-18.847 R7.1@-8.687,-17.653 v1(-7.747,-17.653) R10.2@-6.807,-17.653
NetQ2_4: Q2.4 R8.1 R11.2 TP4.1 | length 4.1
  Top Layer w0.254: Q2.4@-9.521,-11.811 -9.144,-11.811 -8.687,-11.354 R8.1@-8.687,-10.16 v1(-7.747,-10.16) R11.2@-6.807,-10.16
NetQ3_4: Q3.4 R9.1 R12.2 TP5.1 | length 4.1
  Top Layer w0.254: Q3.4@-9.521,-4.318 -9.144,-4.318 -8.687,-3.861 R9.1@-8.687,-2.667 v1(-7.747,-2.667) R12.2@-6.807,-2.667
NetQ4_4: Q4.4 R13.1 R17.2 Z1.2 | length 8.5
  Top Layer w0.254: Z1.2@11.557,6.293 13.862,6.293 R17.2@14.935,7.366 ; Q4.4@13.839,9.271 14.224,9.271 14.935,8.56 R17.2@14.935,7.366 ; R13.1@17.069,7.366 R17.2@14.935,7.366
NetQ5_4: Q5.4 R14.1 R18.2 TP8.1 | length 4.2
  Top Layer w0.254: R14.1@-1.321,-17.653 v1(-0.419,-17.653) R18.2@0.483,-17.653 0.483,-18.517 1.27,-19.304 Q5.4@1.655,-19.304
NetQ6_4: Q6.4 R15.1 R19.2 TP9.1 | length 4.3
  Top Layer w0.254: R15.1@-1.321,-10.16 v1(-0.381,-10.16) R19.2@0.559,-10.16 0.559,-11.227 1.143,-11.811 Q6.4@1.655,-11.811
NetQ7_4: Q7.4 R16.1 R20.2 TP10.1 | length 4.2
  Top Layer w0.254: R16.1@-1.321,-2.667 v1(-0.381,-2.667) R20.2@0.559,-2.667 0.559,-3.607 1.27,-4.318 Q7.4@1.655,-4.318
NetR28_2: R28.2 R31.1 R33.1 | length 3.7
  Top Layer w0.254: R28.2@11.379,-24.511 R33.1@13.259,-24.511 R31.1@13.259,-22.733
NetR30_2: R30.2 U1.8 | length 4
  Top Layer w0.2: U1.8@18.488,-12.163 18.488,-13.789 19.304,-14.605 R30.2@19.304,-15.799
OC/CBC: C9.2 R2.2 TP15.1 U1.50 U1.53 | length 11.3
  Top Layer w0.2: R2.2@12.446,-15.799 11.379,-14.732 C9.2@11.379,-13.97 v1(12.319,-13.97) 13.462,-12.827 13.462,-9.398 13.897,-8.963 U1.50@14.888,-8.963 ; 13.462,-10.163 U1.53@14.888,-10.163
OP1N: R3.1 R4.1 R6.2 TP31.1 U1.3 | length 12.1
  Top Layer w0.2: R6.2@11.379,-19.177 v1(12.954,-19.177) ; R4.1@16.053,-17.399 v1(16.053,-16.51) R3.1@16.053,-15.621 16.053,-14.427 16.488,-13.992 U1.3@16.488,-12.163
  Bottom Layer w0.2: v1(12.954,-19.177) 14.986,-19.177 16.053,-18.11 v1(16.053,-16.51)
OP1OUT: R2.1 R3.2 R4.2 R5.1 TP29.1 U1.4 | length 13.5
  Top Layer w0.2: R5.1@10.668,-17.221 v1(11.557,-17.221) R2.1@12.446,-17.221 ; U1.4@16.888,-12.163 16.888,-13.967 17.475,-14.554 R3.2@17.475,-15.621 v1(17.475,-16.51) R4.2@17.475,-17.399
  Signal Layer 2 w0.2: v1(11.557,-17.221) 16.764,-17.221 v1(17.475,-16.51)
OP1P: C13.1 R24.2 R25.2 R26.1 TP33.1 U1.2 | length 15.5
  Top Layer w0.2: R24.2@11.379,-22.733 C13.1@11.379,-20.955 11.557,-20.777 R26.1@14.097,-20.777 v1(15.05,-20.777) ; R25.2@16.002,-20.777 v1(15.05,-20.777) ; U1.2@16.088,-12.163 16.088,-13.63 15.05,-14.668 v1(15.05,-20.777)
R+: C31.2 C32.2 C33.2 C34.2 C35.2 Q5.1 Q5.2 Q5.3 Q6.1 Q6.2 Q6.3 Q7.1 Q7.2 Q7.3 R18.1 R19.1 R20.1 R22.2 R24.1 R35.1 TP11.1 | length 78.6
  Top Layer w0.2: R22.2@5.334,0.252 v1(5.334,2.413) 5.842,2.921 8.001,2.921 8.509,2.413 8.509,-21.285 R24.1@9.957,-22.733 ; v1(21.971,4.953) 22.733,4.191 R35.1@22.733,3.251
  Signal Layer 1 w0.381: v1(-10.795,-24.384) -10.795,-25.908 -7.747,-28.956 -4.064,-28.956 -3.302,-28.194 -3.302,-25.908 -2.286,-24.892 0.254,-24.892 v1(2.921,-22.225) 3.302,-22.606 v1(4.445,-22.606)
  Bottom Layer w0.2: v1(5.334,2.413) 5.842,2.921 10.033,2.921 12.065,4.953 v1(21.971,4.953)
  Bottom Layer w0.381: C31.2@-10.795,-25.07 v1(-10.795,-24.384) ; C32.2@-1.956,-1.016 2.032,-1.016 v1(2.286,-1.27)
  other v1: 2.921,-22.86 3.556,-22.86 5.461,-22.606 6.477,-22.606 7.366,-22.606 3.556,-22.225 2.921,-21.59 3.556,-21.59 4.445,-21.59 5.461,-21.59 6.477,-21.59 7.366,-21.59 2.921,-20.955 3.556,-20.955 4.445,-20.574 5.461,-20.574 6.477,-20.574 7.366,-20.574 2.921,-20.32 3.556,-20.32 4.445,-19.558 5.461,-19.558 6.477,-19.558 7.366,-19.558 4.445,-18.542 5.461,-18.542 6.477,-18.542 7.366,-18.542 4.445,-17.526 5.461,-17.526 6.477,-17.526 7.366,-17.526 3.048,-15.367 3.683,-15.367 4.445,-14.986 5.461,-14.986 6.477,-14.986 7.366,-14.986 3.048,-14.732 3.683,-14.732 3.048,-14.097 3.683,-14.097 4.445,-13.97 5.461,-13.97 6.477,-13.97 7.366,-13.97 3.048,-13.462 3.683,-13.462 4.445,-12.954 5.461,-12.954 6.477,-12.954 7.366,-12.954 3.048,-12.827 3.683,-12.827 3.683,-12.192 4.445,-11.938 5.461,-11.938 6.477,-11.938 7.366,-11.938 3.683,-11.557 3.683,-10.922 4.445,-10.922 5.461,-10.922 6.477,-10.922 7.366,-10.922 4.572,-10.033 5.461,-10.033 6.477,-10.033 7.366,-10.033 4.572,-9.017 5.461,-9.017 6.477,-9.017 7.366,-9.017 3.048,-8.382 3.683,-8.382 4.572,-8.001 5.461,-8.001 6.477,-8.001 7.366,-8.001 3.048,-7.747 3.683,-7.747 3.048,-7.112 3.683,-7.112 4.572,-6.985 5.461,-6.985 6.477,-6.985 7.366,-6.985 3.048,-6.477 3.683,-6.477 3.048,-5.842 3.683,-5.842 4.572,-5.842 5.461,-5.842 6.477,-5.842 7.366,-5.842 3.429,-2.032 4.191,-2.032 4.953,-2.032 5.715,-2.032 6.477,-2.032 2.286,-1.905 3.429,-1.397 4.191,-1.397 4.953,-1.397 5.715,-1.397 6.477,-1.397 7.239,-1.397 2.286,-0.635 3.048,-0.635 7.62,-0.635 3.048,0 7.62,0 3.048,0.635 7.62,0.635
SN: R21.2 U1.24 | length 11.7
  Top Layer w0.2: U1.24@21.688,-7.763 23.237,-7.763 23.914,-7.086 23.914,-5.238 24.511,-4.641 R21.2@24.511,1.829
SP: R35.2 U1.25 | length 11.6
  Top Layer w0.2: U1.25@21.688,-7.363 23.071,-7.363 23.514,-6.92 23.514,-5.073 24.111,-4.476 24.111,0.451 R35.2@22.733,1.829
SPI_SCLK: P1.5 TP34.1 U1.13 | length 35.7
  Top Layer w0.2: U1.13@20.488,-12.163 20.488,-12.741 20.79,-13.043 22.263,-13.043 24.003,-11.303 v1(26.797,-11.303)
  Signal Layer 2 w0.2: P1.5@8.128,-26.797 9.271,-25.654 12.7,-25.654 15.164,-23.19 17.681,-23.19 25.654,-15.217 25.654,-12.446 v1(26.797,-11.303)
  Bottom Layer w0.2: TP34.1@25.527,-11.303 v1(26.797,-11.303)
SPI_SIMO: P1.2 TP37.1 U1.16 | length 43.2
  Top Layer w0.2: U1.16@21.688,-10.963 22.565,-10.963 24.892,-8.636 v1(26.797,-8.636)
  Signal Layer 2 w0.2: P1.2@0.508,-26.797 2.851,-24.454 12.191,-24.454 14.655,-21.99 17.184,-21.99 24.454,-14.72 24.454,-10.979 v1(26.797,-8.636)
  Bottom Layer w0.2: v1(26.797,-8.636) TP37.1@27.94,-8.636
SPI_SOMI: P1.3 TP36.1 U1.15 | length 40
  Top Layer w0.2: U1.15@21.688,-11.363 22.731,-11.363 24.569,-9.525 v1(26.797,-9.525)
  Signal Layer 2 w0.2: P1.3@3.048,-26.797 4.991,-24.854 12.357,-24.854 14.821,-22.39 17.349,-22.39 24.854,-14.885 24.854,-11.468 v1(26.797,-9.525)
  Bottom Layer w0.2: TP36.1@25.527,-9.525 v1(26.797,-9.525)
SPI_STE: P1.4 TP35.1 U1.14 | length 37.6
  Top Layer w0.2: U1.14@20.888,-12.163 22.508,-12.163 24.257,-10.414 v1(26.797,-10.414)
  Signal Layer 2 w0.2: P1.4@5.588,-26.797 7.131,-25.254 12.534,-25.254 14.998,-22.79 17.515,-22.79 25.254,-15.051 25.254,-11.957 v1(26.797,-10.414)
  Bottom Layer w0.2: v1(26.797,-10.414) TP35.1@27.94,-10.414